# Altium PCB QKD-LD-002-OLD.PcbDoc
Units mm, origin at the board's own origin, x right, y up, seen from the top; angles counter-clockwise.
Board outline 57.48 x 32.21 mm, 2 copper layers (Top Layer, Bottom Layer); 46 components, 27 nets, 139 pads, 159 vias.
Unrouted connection lines stored in the file: 3.
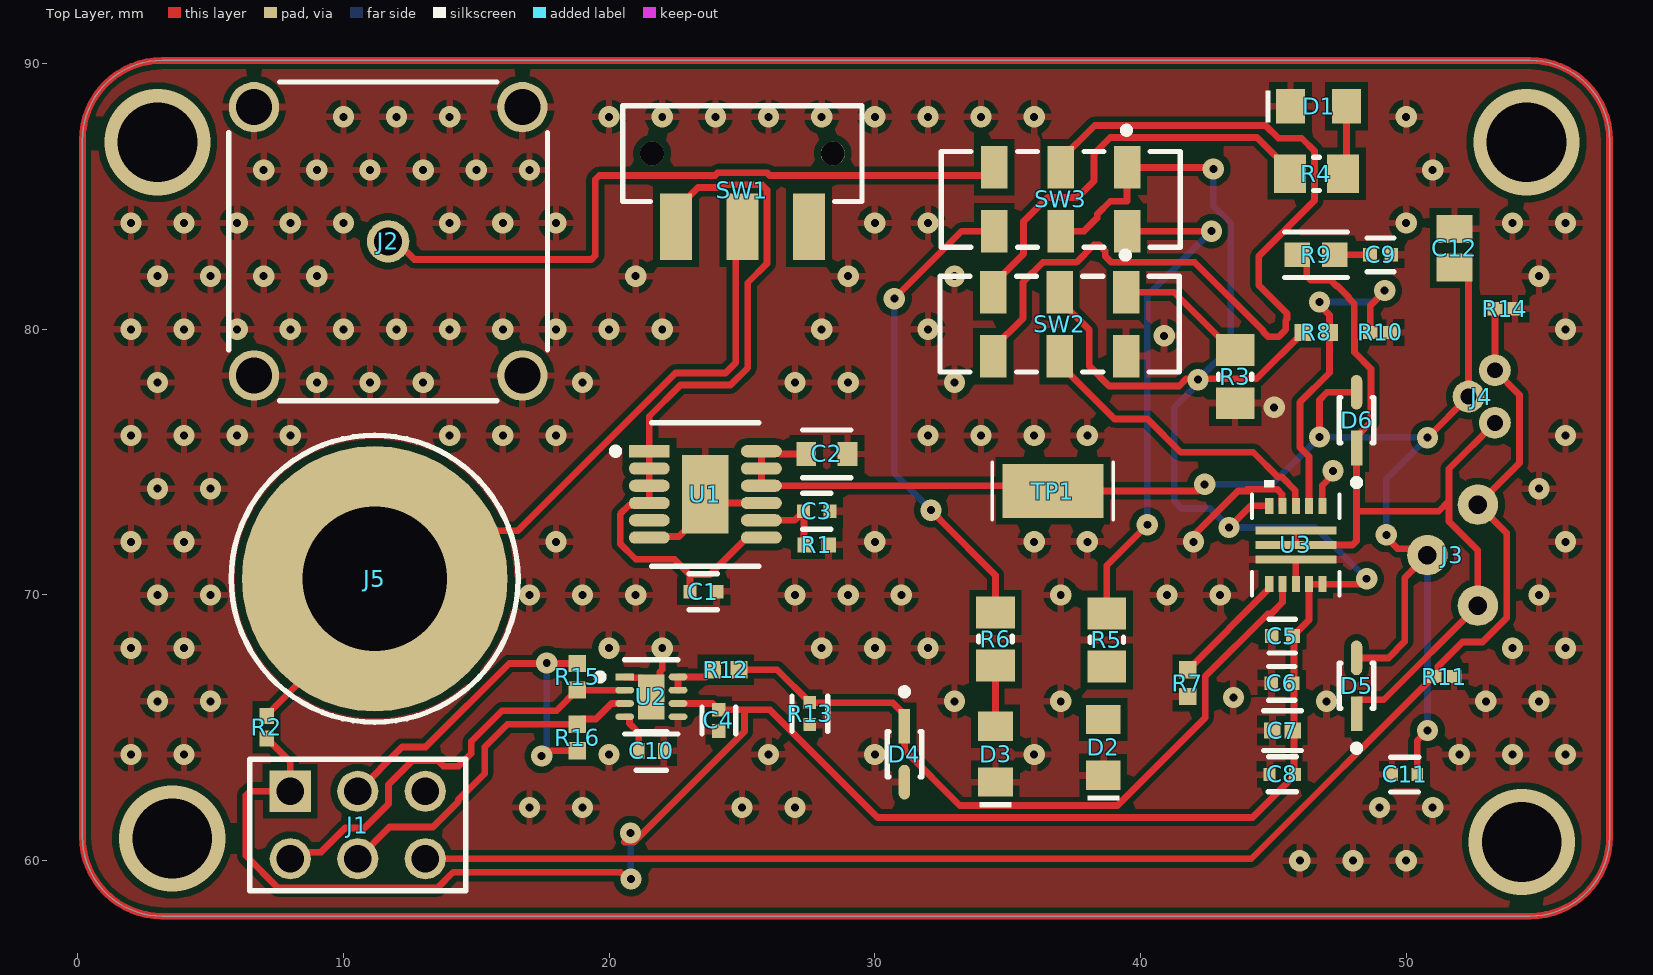
[diagram p0: Top Layer view]
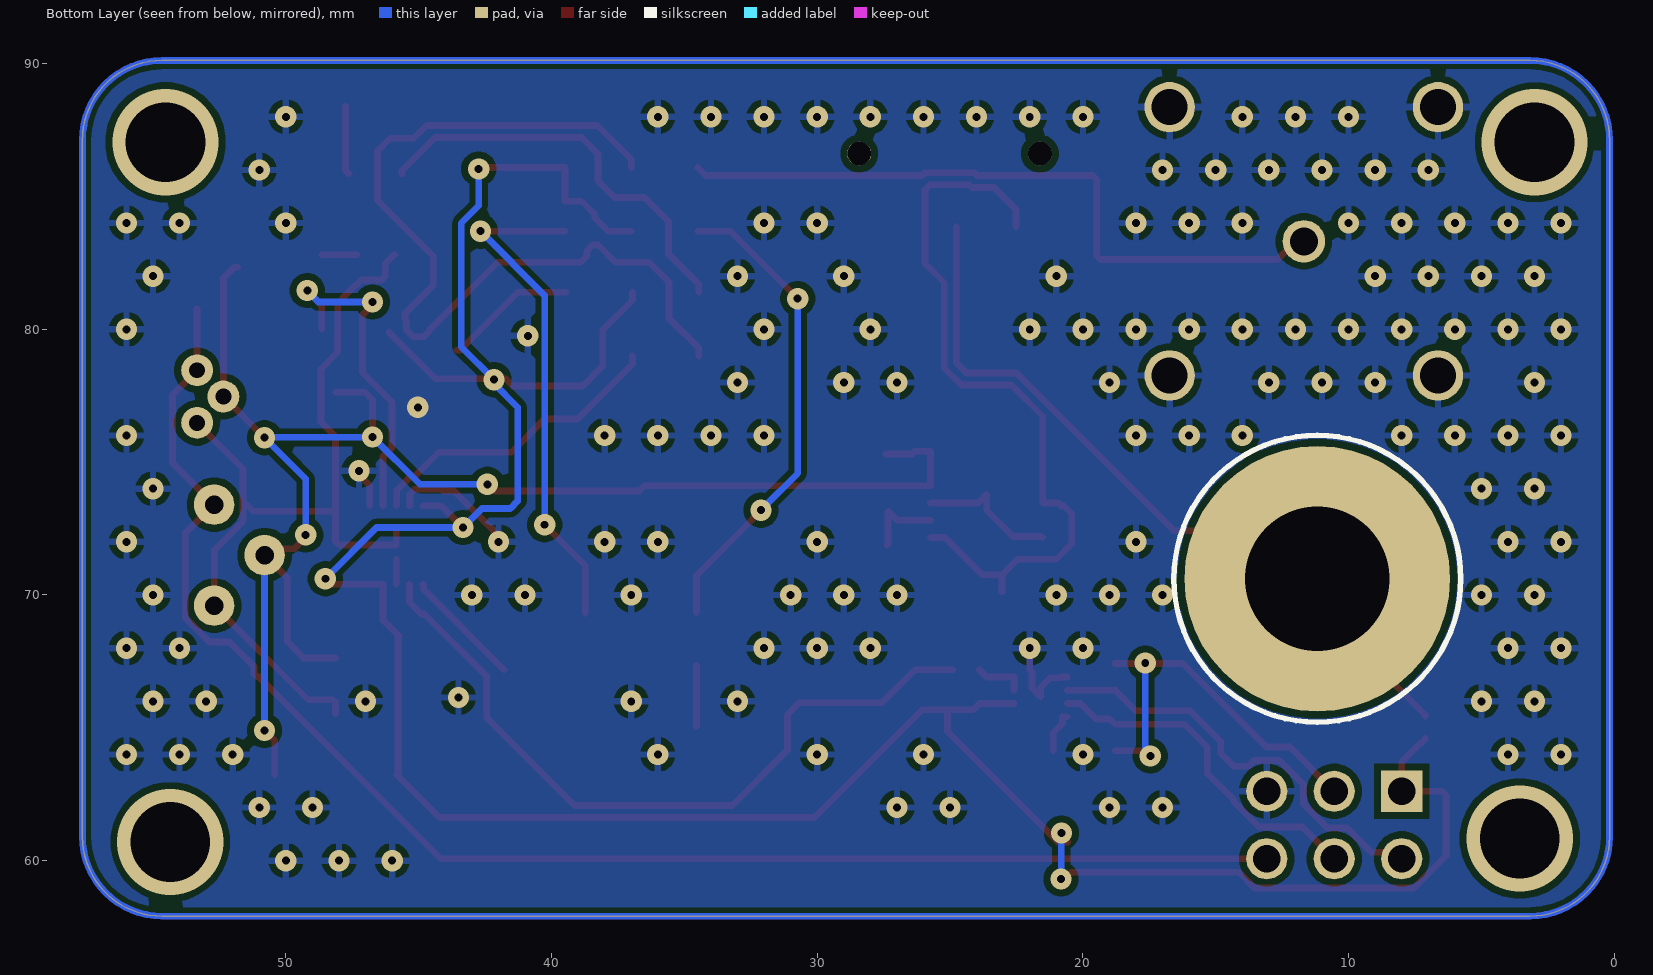
[diagram p1: Bottom Layer view, seen from below]
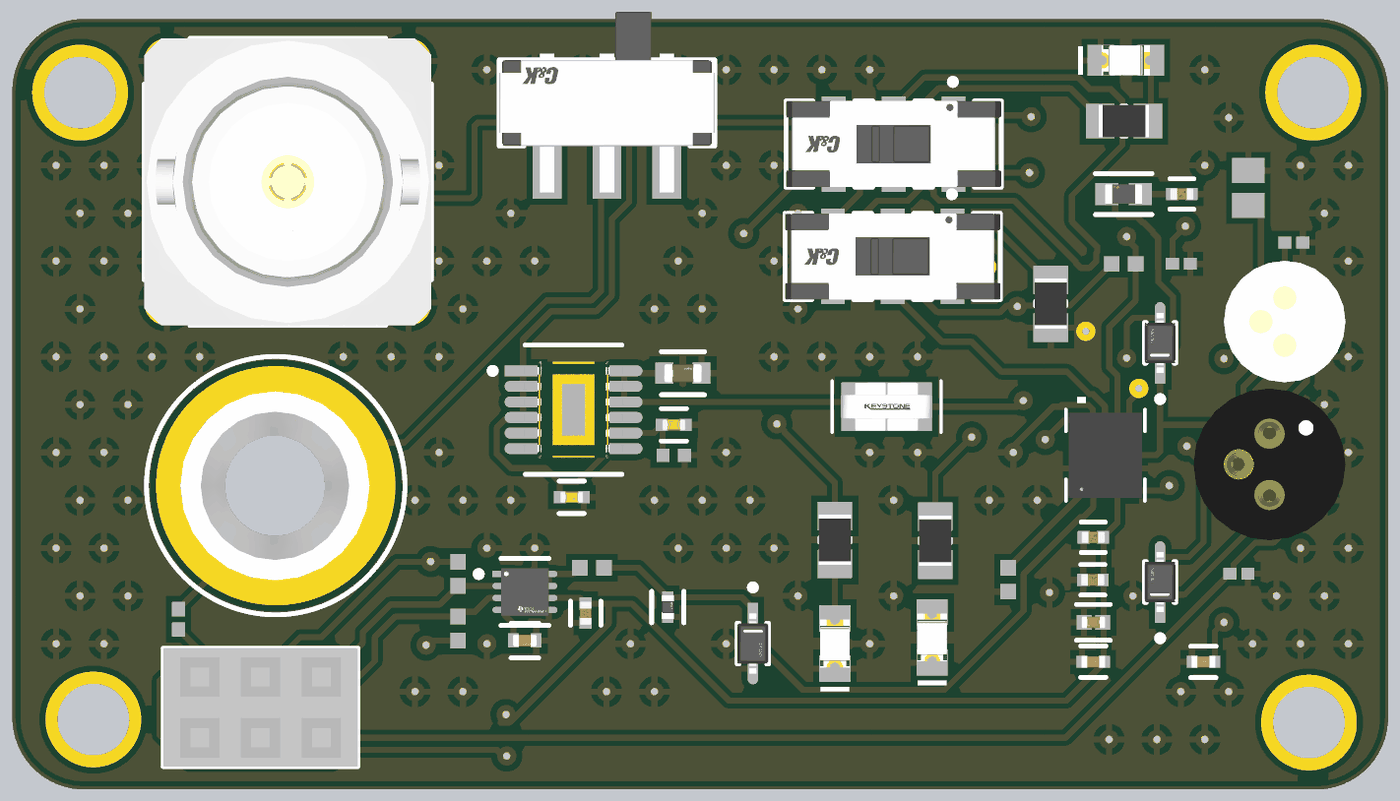
[diagram p2: 3D render of the assembled board from above, using the file's embedded part models]

## Layer stack, top to bottom
Top Solder: solder mask 0.0102, Solder Resist, Dk 3.5
Top Layer: signal copper 0.0356
Dielectric 1: dielectric 0.32, FR-4, Dk 4.8
Bottom Layer: signal copper 0.0356
Bottom Solder: solder mask 0.0102, Solder Resist, Dk 3.5

## Board outline
0.175,60.912 0.175,87.122 cw(c3.175,87.122) 3.175,90.122 54.658,90.122 cw(c54.658,87.122) 57.658,87.122 57.658,60.912 cw(c54.658,60.912) 54.658,57.912 3.175,57.912 cw(c3.175,60.912)

## Design rules (kind name [scope] priority, off if disabled: settings)
Clearance [All] p1: gap=0.254 ignorepadtopadclearanceinfootprint=FALSE except(0.2: Arc-Arc Arc-Track Arc-SMDPad Arc-THPad Arc-Via Arc-Fill Arc-Poly Arc-Region Arc-Text Arc-Hole Track-Track Track-SMDPad Track-THPad Track-Via Track-Fill Track-Poly Track-Region Track-Text Track-Hole)
PolygonConnect [All] p1: connectstyle=Relief reliefconductorwidth=0.254 reliefentries=4 polygonreliefangle="90 Angle" airgapwidth=0.254
RoutingVias [All] p1: holewidth=0.711 width=1.27 viastyle="Through Hole" minholewidth=0.711 minwidth=1.27 maxholewidth=0.711 maxwidth=1.27
SolderMaskExpansion [All] p1: expansion=0 istentingtop=FALSE
SupplyNets "Schematic Supply Nets_1" [InNet('GND')] p1: voltage=0.000
SupplyNets "Schematic Supply Nets" [InNet('VBIAS')] p2: voltage=0.000
Width [All] p1: maxlimit=0.254 minlimit=0.254 preferedwidth=0.254
30 further rules are at their usual default settings.

## Classes and differential pairs
component class "Power Regulation and Interfaces": C1 C2 C3 D1 D2 D3 J2 J5 R1 R2 R3 R4 R5 R6 SW1 SW2 SW3 TP1 U1
component class "Laser Driver": C4 C5 C6 C7 C8 C9 C10 C11 C12 D4 D5 D6 J3 J4 R7 R8 R9 R10 R11 R12 R13 R14 R15 R16 U2 U3

## Components (designator, comment, footprint, x,y, rotation, side; value= is the part's Value field where it differs from the comment)
C1 "4.7u" FP-CC0402-MFG 23.547,70.127 r0 top value="4.7 uF"
C2 "47 uF" FP-GRM188-0_2-MFG 28.194,75.311 r0 top
C3 "4.7u" FP-CC0402-MFG 27.813,73.152 r180 top value="4.7 uF"
C4 "100nF" FP-C0402-BB-MFG 24.13,65.278 r270 top value="0.10 μF"
C5 "100nF" FP-C0402-BB-MFG 45.339,68.453 r0 top value="0.10 μF"
C6 "100nF" FP-C0402-BB-MFG 45.32,66.675 r0 top value="0.10 μF"
C7 "10 uF" FP-GRM155-0_2-IPC_C 45.347,64.897 r180 top
C8 "1uF" FP-0402-L_1_0_0_05-W_0_5-MFG 45.339,63.246 r180 top
C9 "100 pF" FP-C0402-BB-MFG 49.041,82.804 r0 top
C10 "2.2u" FP-GRM155-0_15-MFG 21.59,64.135 r0 top
C11 "1uF" FP-0402-L_1_0_0_05-W_0_5-MFG 49.944,63.246 r0 top
C12 "100nF" CAPC2013X145X50LL20T20 51.816,83.058 r270 top
D1 "LASER ON" WL-SMCW_0805_150080xx75000 46.702,88.392 r0 top
D2 "CW" WL-SMCW_0805_150080xx75000 38.608,64.262 r90 top
D3 "PULSE" WL-SMCW_0805_150080xx75000 34.544,64.008 r90 top
D4 "2.4V" FP-SOD323-IPC_B 31.115,64.008 r270 top
D5 "D22V0S1U2WS-7" FP-SOD323-IPC_B 48.133,66.582 r90 top
D6 "D22V0S1U2WS-7" FP-SOD323-IPC_B 48.133,76.581 r90 top
J1 "SSW-103-01-G-D" SMTC-SSW-103-01-X-D 8.001,62.611 r0 top
J2 "71K101-400A5" ROS-71K101-400A5_V 11.684,83.312 r0 top
J3 "S8060 mount" PCBComponent_1#1 53.848,70.485 r0 top
J4 "S7060R Mount" PCBComponent_1#2 53.34,77.47 r270 top
J5 "575-4" KSTN-575-4 11.176,70.612 r0 top
R1 "49.9k" RESC1005X40X25NL05T05 27.813,71.882 r180 top
R2 "0" RESC1005X40X25NL05T10 7.112,65.024 r270 top
R3 "1k" RESC2013X60X35ML10T20 43.561,78.216 r270 top
R4 "1k" RESC2013X60X35ML10T20 46.625,85.852 r0 top
R5 "1k" RESC2013X60X35ML10T20 38.735,68.31 r270 top
R6 "1k" RESC2013X60X35ML10T20 34.544,68.342 r270 top
R7 "20k" RESC1005X40X25ML05T05 41.783,66.683 r90 top
R8 "20k" RESC1005X40X25ML05T05 46.617,79.883 r180 top
R9 "10" FP-TFCR0603-IPC_B 46.609,82.804 r0 top
R10 "10k" RESC1005X40X25LL10T10 49.022,79.883 r180 top
R11 "10k" RESC1005X40X25LL10T10 51.429,66.929 r180 top
R12 "20k" RESC1005X40X25ML05T05 24.392,67.183 r0 top
R13 "1.8k" FP-RN73R1E-IPC_C 27.559,65.532 r90 top
R14 "10k" RESC1005X40X25LL10T10 53.721,80.772 r180 top
R15 "20k" RESC1005X40X25ML05T05 18.796,66.921 r90 top
R16 "20k" RESC1005X40X25ML05T05 18.796,64.635 r270 top
SW1 "JS102011SAQN" FP-JS102011SAQN-MFG 25.019,86.614 r180 top
SW2 "JS202011JCQN" FP-JS202011JCQN-MFG 36.957,80.194 r180 top
SW3 "JS202011JCQN" FP-JS202011JCQN-MFG 36.997,84.893 r180 top
TP1 "5019" 5019_MFG 36.703,73.914 r0 top
U1 "LT3045EMSE#TRPBF" FP-MSE-12-05-08-1666-IPC_B 23.622,73.787 r0 top
U2 "DAC53701DSGR" FP-DSG0008A-IPC_B 21.59,66.167 r0 top
U3 "LMH13000RQER" XLMH13000RQER.A_WQFN-HR_TXI_TEX 45.847,71.882 r90 top

## Footprints (in the part's own frame and the unit in brackets; to place one, negate y for a bottom-side part, rotate by r counter-clockwise, add the part's x,y. Pads: shape width x height; smd on the part's side, far side on the other; paste and mask are expansions set on the pad)
5019_MFG [mm] "Recommended Land Pattern"
  rect 3.8x2.03 smd paste+0 mask+0: 1(0,0)
  silkscreen extent -2.27,-1.08 2.27,1.08, body extent -1.91,-1.01 1.91,1.01, height 2.42
CAPC2013X145X50LL20T20 [mm] "Chip Capacitor, 2-Leads, Body 2.00x1.25mm, IPC High Density"
  rect 1.05x1.35 smd: 1(-0.725,0) 2(0.725,0)
  body extent -1.1,-0.72 1.1,0.72, height 1.45
FP-0402-L_1_0_0_05-W_0_5-MFG [mm]
  rect 0.45x0.5 smd paste+0 mask+0: 1(-0.475,0) 2(0.475,0)
  silkscreen extent -0.53,-0.66 0.53,0.65, body extent -0.8,-0.38 0.8,0.38, height 0.25
FP-C0402-BB-MFG [mm]
  rect 0.52x0.52 smd paste+0 mask+0: 1(-0.4,0) 2(0.4,0)
  silkscreen extent -0.5,-0.64 0.5,0.64, body extent -0.8,-0.4 0.8,0.4, height 0.25
FP-CC0402-MFG [mm]
  rect 0.5x0.5 smd paste+0 mask+0: 1(-0.5,0) 2(0.5,0)
  silkscreen extent -0.53,-0.68 0.53,0.67, body extent -0.87,-0.48 0.87,0.48, height 0.25
FP-DSG0008A-IPC_B [mm]
  rect 0.706x0.257 smd paste+0 mask+0: 1(-1.003,0.75)
  rrect100% 0.706x0.257 smd paste+0 mask+0: 2(-1.003,0.25) 3(-1.003,-0.25) 4(-1.003,-0.75) 5(1.003,-0.75) 6(1.003,-0.25) 7(1.003,0.25) 8(1.003,0.75)
  rect 1x1.7 smd paste-1000 mask+0: 9(0,0)
  silkscreen extent -2.06,-1.4 1,1.4, body extent -1.61,-1.25 1.61,1.25, height 0.25
FP-GRM155-0_2-IPC_C [mm]
  rect 0.628x0.606 smd paste+0 mask+0: 1(-0.389,0) 2(0.389,0)
  silkscreen extent -0.7,-0.75 0.7,0.75, body extent -0.8,-0.45 0.8,0.45, height 0.25
FP-GRM155-0_15-MFG [mm]
  rect 0.45x0.6 smd paste+0 mask+0: 1(-0.475,0) 2(0.475,0)
  silkscreen extent -0.58,-0.73 0.58,0.72, body extent -0.8,-0.43 0.8,0.43, height 0.25
FP-GRM188-0_2-MFG [mm]
  rect 0.75x0.9 smd paste+0 mask+0: 1(-0.775,0) 2(0.775,0)
  silkscreen extent -0.9,-0.9 0.9,0.9, body extent -1.25,-0.6 1.25,0.6, height 0.25
FP-JS102011SAQN-MFG [mm]
  rect 1.2x2.5 smd paste+0 mask+0: 1(-2.5,2.75) 2(0,2.75) 3(2.5,2.75)
  round 0.9 hole 0.9 unplated paste-2539.97 mask+0: ""(-3.4,0) ""(3.4,0)
  silkscreen extent -4.5,-1.8 4.5,1.8, body extent -4.6,-3.9 4.6,4.1, height 0.25
FP-JS202011JCQN-MFG [mm]
  rect 1x1.6 smd paste+0 mask+0: 1(-2.5,-1.2) 2(0,-1.2) 3(2.5,-1.2) 5(-2.5,1.2) 6(0,1.2) 7(2.5,1.2)
  silkscreen extent -4.5,-2.72 4.5,1.8, body extent -4.6,-2.1 4.6,2.1, height 0.25
FP-MSE-12-05-08-1666-IPC_B [mm]
  rect 1.54x0.455 smd paste+0 mask+0: 1(-2.11,1.625)
  rrect100% 1.54x0.455 smd paste+0 mask+0: 2(-2.11,0.975) 3(-2.11,0.325) 4(-2.11,-0.325) 5(-2.11,-0.975) 6(-2.11,-1.625) 7(2.11,-1.625) 8(2.11,-0.975) 9(2.11,-0.325) 10(2.11,0.325) 11(2.11,0.975) 12(2.11,1.625)
  rect 1.753x2.947 smd paste-1000 mask+0: 13(0,0)
  silkscreen extent -3.5,-2.7 2.02,2.7, body extent -3.13,-2.27 3.13,2.27, height 0.25
FP-RN73R1E-IPC_C [mm]
  rect 0.488x0.472 smd paste+0 mask+0: 1(-0.414,0) 2(0.414,0)
  silkscreen extent -0.66,-0.67 0.66,0.67, body extent -0.76,-0.38 0.76,0.38, height 0.25
FP-SOD323-IPC_B [mm]
  rect 1.306x0.432 smd paste+0 mask+0: 1(-1.05,0)
  rrect100% 1.306x0.432 smd paste+0 mask+0: 2(1.05,0)
  silkscreen extent -2.47,-0.65 0.85,0.65, body extent -1.95,-0.9 1.95,0.9, height 0.25
FP-TFCR0603-IPC_B [mm]
  rect 0.958x0.912 smd paste+0 mask+0: 1(-0.702,0) 2(0.702,0)
  silkscreen extent -1.18,-0.86 1.18,0.86, body extent -1.43,-0.71 1.43,0.71, height 0.25
KSTN-575-4 [mm] "Banana Jack, Non-Insulated, Dia 7.92mm"
  round 10 hole 5.45: 1(0,0)
  silkscreen extent -5.4,-5.4 5.4,5.4, body extent -3.98,-3.96 3.92,3.94, height 2.36
PCBComponent_1#1 [mil]
  round 60 hole 27.56: 1(-45.2,114.8) 3(-45.2,-34.8) ""(-120,40)
  body extent -170,-85 80,165, height 190
PCBComponent_1#2 [mil]
  round 47.24 hole 23.62: 1(-38.98,0) 2(0,-38.98) 3(38.98,0)
  body extent -100,-100 100,100, height 198
RESC1005X40X25LL10T10 [mm] "Chip Resistor, 2-Leads, Body 1.00x0.50mm, IPC High Density"
  rect 0.55x0.5 smd: 1(-0.375,0) 2(0.375,0)
  body extent -0.55,-0.3 0.55,0.3, height 0.4
RESC1005X40X25ML05T05 [mm] "Chip Resistor, 2-Leads, Body 1.00x0.50mm, IPC Low Density"
  rect 0.65x0.65 smd: 1(-0.5,0) 2(0.5,0)
  body extent -0.53,-0.27 0.53,0.28, height 0.4
RESC1005X40X25NL05T05 [mm] "Chip Resistor, 2-Leads, Body 1.00x0.50mm, IPC Medium Density"
  rect 0.55x0.55 smd: 1(-0.45,0) 2(0.45,0)
  body extent -0.53,-0.27 0.53,0.28, height 0.4
RESC1005X40X25NL05T10 [mm] "Chip Resistor, 2-Leads, Body 1.00x0.50mm, IPC Medium Density"
  rect 0.6x0.55 smd: 1(-0.425,0) 2(0.425,0)
  body extent -0.53,-0.27 0.53,0.28, height 0.4
RESC2013X60X35ML10T20 [mm] "Chip Resistor, 2-Leads, Body 2.1x1.35mm, IPC Low Density"
  rect 1.2x1.45 smd: 1(-1,0) 2(1,0)
  silkscreen extent -0.1,-0.63 0.1,0.63, body extent -1.05,-0.68 1.05,0.67, height 0.6
ROS-71K101-400A5_V [mm] "75R BNC, Straight Jack, 12x12x15mm, Rosenberger Recommended"
  round 1.6 hole 1.05: 1(0,0)
  round 1.9 hole 1.35: MH(-5.05,-5.05) MH(-5.05,5.05) MH(5.05,-5.05) MH(5.05,5.05)
  silkscreen extent -6,-6 6,6, body extent -6,-6 6,6, height 15
SMTC-SSW-103-01-X-D [mm] "SQ Post Socket, 2x3 Pins, Vertical, 2.54mm Pitch, Female"
  rect 1.55x1.55 hole 1.04: 1(0,0)
  round 1.55 hole 1.04: 2(0,-2.54) 3(2.54,0) 4(2.54,-2.54) 5(5.08,0) 6(5.08,-2.54)
  silkscreen extent -1.53,-3.74 6.61,1.2, body extent -1.52,-3.75 6.6,1.21, height 8.51
WL-SMCW_0805_150080xx75000 [mm] "SMD Mono-color Chip LED, body 2.0x1.25mm"
  rect 1.1x1.3 smd: 1(-1.05,0) 2(1.05,0)
  silkscreen extent -2,-0.6 -1.8,0.6, body extent -1,-0.63 1,0.62, height 0.7
XLMH13000RQER.A_WQFN-HR_TXI_TEX [mm]
  rect 0.6x0.305 smd paste+0 mask+0: 1(-1.475,1) 2(-1.475,0.5) 3(-1.475,0) 4(-1.475,-0.5) 5(-1.475,-1) 9(1.475,-1) 10(1.475,-0.5) 11(1.475,0) 12(1.475,0.5) 13(1.475,1)
  rect 0.305x3.048 smd paste+0 mask+0: 6(-0.55,0) 7(0,0) 8(0.55,0)
  silkscreen extent -1.91,-1.65 2.44,1.65, body extent -1.78,-1.52 1.78,1.52, height 0.81

## Part data
C1 C3: library part CMP-03422-001389-1, "CAP CER 4.7UF 6.3V X5R 0402", Capacitance="4.7 uF", Manufacturer=YAGEO, Manufacturer Part Number=CC0402KRX5R5BB475, Package=CC0402, Temperature="-55°C to +125°C", Temperature Characteristic=X5R, Temperature Coefficient=30ppm/°C, Temperature Range High=+125°C, Temperature Range Low=-55°C, Tolerance=0.1, Voltage Rating="6.3 V", Automotive=No, Automotive Grade=NA, Category=Cap, ComponentLink2Description=Datasheet, ComponentLink2URL=http://www.yageo.com/documents/recent/UPY-GP_NP0_16V-to-50V_16.pdf, Device Class L1="Passive Components", Device Class L2=Capacitors, Device Class L3="Ceramic Capacitors", Digikey Description="CAP CER 4.7UF 6.3V X5R 0402", Footprint Url=http://www.yageo.com/exep/pages/download/literatures/UPY-C_GEN_24.pdf, Height=0.55mm, Ipc Land Pattern Name=CAPC10050X50, Lead Free=Yes, Material=Ceramic, Mouser Description="0402 4.7 uF 6.3 V ±10% Tolerance X5R SMT Multilayer Ceramic Capacitor", Octopart=https://octopart.com/cc0402krx5r5bb475-yageo-71498076, RoHS=TRUE
C2: library part CMP-06035-023005-1, "Chip Multilayer Ceramic Capacitors for General Purpose, 0603, 47uF, X5R, 15%, 20%, 6.3V"
C4 C5 C6: library part CMP-1034-02069-4, "CAP CER 0.1UF 16V 10% X5R 0402", Capacitance="0.10 μF", Manufacturer=Kemet, Manufacturer Part Number=C0402C104K4PACTU, Package=C0402-BB, Temperature="-55°C to +125°C", Temperature Characteristic=X5R, Temperature Coefficient=15%, Temperature Range High=+125°C, Temperature Range Low=-55°C, Tolerance=0.1, Voltage Rating="16 V", Automotive=No, Category=Cap, ComponentLink2Description=Datasheet, ComponentLink2URL=https://content.kemet.com/datasheets/KEM_C1002_X7R_SMD.pdf, Device Class L1="Passive Components", Device Class L2=Capacitors, Device Class L3="Ceramic Capacitors", Digikey Description="CAP CER 0.1UF 16V 10% X5R 0402", Height=0.55mm, Ipc Land Pattern Name=CAPC10050X50, Lead Free=Yes, Material=Ceramic, Mouser Description="Multilayer Ceramic Capacitors MLCC - SMD/SMT 16volts 0.1uF 10% X5R", Octopart=https://octopart.com/c0402c104k4pactu-kemet-8375715, RoHS=TRUE
C7: library part CMP-06035-053439-1, "Chip Multilayer Ceramic Capacitors for General Purpose, 0402, 10uF, X5R, 15%, 20%, 10V"
C8 C11: library part CMP-14477-003599-2, "None", RoHS Compliant=Yes
C9: library part CMP-03020-017256-1, "C0402 100 pF U2J 2.00% 10 V", Manufacturer=Kemet, Manufacturer Part Number=C0402C101G8JACAUTO, Package=C0402-BB, Temperature="-55°C to +125°C", Temperature Characteristic=U2J, Temperature Coefficient=15%, Temperature Range High=+125°C, Temperature Range Low=-55°C, Tolerance=0.02, Voltage Rating="10 V", Automotive=No, Capacitance="100 pF", Category=Cap, ComponentLink2Description=Datasheet, ComponentLink2URL=https://content.kemet.com/datasheets/KEM_C1002_X7R_SMD.pdf, Device Class L1="Passive Components", Device Class L2=Capacitors, Device Class L3="Ceramic Capacitors", Height=0.55mm, Ipc Land Pattern Name=CAPC10050X50, Lead Free=Yes, Material=Ceramic, Octopart=https://octopart.com/c0402c101g8jacauto-kemet-84730079, RoHS=TRUE
C10: library part CMP-06035-015498-1, "Chip Multilayer Ceramic Capacitors for General Purpose, 0402, 2.2uF, X7T, +22%/-33%, 20%, 16V"
C12: library part CMP-2007-01396-1, Manufacturer=Vitramon, Part Number=VJ0805Y104JXXPW1BC
D1: library part CMP-1426-00011-5, "LED Uni-Color Red 630nm 2-Pin Chip 0805(2012Metric) T/R", Case Code (Imperial)=0805, Case Code (Metric)=2012, Color=Red, Forward Current=100mA, Forward Voltage=2V, Manufacturer Lifecycle Status=ACTIVE, Manufacturer Package Identifier="0805 (2012 metric)", Max Junction Temperature (Tj)=95°C, Max Operating Temperature=85°C, Max Reverse Voltage (DC)=5V, Min Operating Temperature=-40°C, Power Dissipation=72mW, Test Current=20mA, Case/Package=0805, Dominant Wavelength=625nm, Height=700µm, Length=2mm, Lens Style="Clear, Rectangular", Lifecycle Status=Production, Luminous Intensity=150mcd, Mount="Surface Mount", Packaging="Tape and Reel", Peak Wavelength=630nm, REACH SVHC=Unknown, RoHS=Compliant, Viewing Angle=140°, Wavelength=625nm, Width=1.25mm, YEOL="1 = Estimated lifetime > 10 years"
D2: library part CMP-1426-00007-5, "WURTH ELEKTRONIK - 150080GS75000 - LED, Green, SMD, 0805, 30 mA, 3.2 V, 520 nm", Case Code (Imperial)=0805, Case Code (Metric)=2012, Color=Green, Forward Current=100mA, Forward Voltage=3.2V, Manufacturer Lifecycle Status=ACTIVE, Manufacturer Package Identifier="0805 (2012 metric)", Max Junction Temperature (Tj)=95°C, Max Operating Temperature=85°C, Max Reverse Voltage (DC)=5V, Min Operating Temperature=-40°C, Power Dissipation=105mW, Test Current=20mA, Case/Package=0805, Dominant Wavelength=525nm, Height=700µm, Length=2mm, Lens Style="Clear, Rectangular", Lifecycle Status=Production, Luminous Intensity=450mcd, Mount="Surface Mount", Packaging="Tape and Reel", Peak Wavelength=515nm, REACH SVHC=Unknown, Reverse Voltage=5V, RoHS=Compliant, Viewing Angle=140°, Wavelength=525nm, Width=1.25mm, YEOL="1 = Estimated lifetime > 10 years"
D3: library part CMP-1426-00008-9, "Wurth Elektronik Blue LED, WL-SMCW Series, 0805 (2012), 470nm, 2x1.25x0.7mm", Case Code (Imperial)=0805, Case Code (Metric)=2012, Color=Blue, Forward Current=100mA, Forward Voltage=3.2V, Manufacturer Lifecycle Status=ACTIVE, Manufacturer Package Identifier="0805 (2012 metric)", Max Junction Temperature (Tj)=95°C, Max Operating Temperature=85°C, Max Reverse Voltage (DC)=5V, Min Operating Temperature=-40°C, Power Dissipation=105mW, Test Current=20mA, Case/Package=0805, Dominant Wavelength=470nm, Height=700µm, Lead Free="Lead Free", Length=2mm, Lens Style="Clear, Rectangular", Lifecycle Status=Production, Luminous Intensity=145mcd, Mount="Surface Mount", Packaging="Tape and Reel", Peak Wavelength=465nm, REACH SVHC=Unknown, Reverse Voltage=5V, RoHS=Compliant, Viewing Angle=140°, Wavelength=470nm, Width=1.25mm, YEOL="1 = Estimated lifetime > 10 years"
D4: library part CMP-12792-000028-1, "DIODE ZENER 2.4V 200MW SOD323", Max Operating Temperature=150°C, Max Power Dissipation=200mW, Max Reverse Leakage Current=50uA, Min Operating Temperature=-65°C, Output Current=50mA, Package Quantity=3000, Test Current=5mA, Tolerance=8%, Contact Plating=Tin, Element Configuration=Single, ESD Protection=No, Height=1mm, Impedance=100R, Lead Free="Lead Free", Length=1.8mm, Mount="Surface Mount", Number of Pins=2, Packaging="Tape and Reel", Peak Reverse Current=50uA, Power Dissipation=200mW, Power Rating=200mW, Radiation Hardening=No, REACH SVHC="No SVHC", Termination=SMD/SMT, Voltage Rating (DC)=2.4V, Voltage Tolerance=8%, Weight=0.000173oz, Width=1.4mm, Zener Current=5mA, Zener Voltage=2.4V
D5 D6: library part CMP-12828-000026-1, "TVS DIODE 22V 37V SOD323", Clamping Voltage=37V, Max Operating Temperature=125°C, Min Breakdown Voltage=24V, Min Operating Temperature=-55°C, Peak Pulse Current=30A, Peak Pulse Power=1kW, Power Line Protection=No, Reverse Standoff Voltage=22V, Composition=Zener, Mount="Surface Mount", Number of Unidirectional Channels=1, Packaging="Tape and Reel"
J1: library part CMP-1023-00331-1, "SQ Post Socket, Through-hole, Vertical, -55 to 125 degC, 2.54 mm Pitch, 6-Pin, Female, RoHS", Manufacturer=Samtec, Temperature Range="-55 to 125 degC", ComponentLink1Description="Manufacturer URL", ComponentLink1URL=http://www.samtec.com, ComponentLink2Description=Datasheet, ComponentLink2URL=http://www.samtec.com/documents/webfiles/pdf/SSW_TH.PDF, ComponentLink3Description="Package Specification", ComponentLink3URL=http://www.samtec.com/documents/webfiles/cpdf/SSW-1XX-XX-XXX-X-XX-XXX-XX-MKT.pdf, DatasheetVersion=F-214, Mounting Technology=Through-hole, Orientation=Vertical, PackageDescription="Assembly, Socket Strip .016 X .031 Tail", PackageReference=SSW-103-01-X-D, PackageVersion="CA, 6/1987", PartNumber=SSW-103-01-G-D, Pitch="2.54 mm", RoHS=True
J2: library part CMP-2000-05853-1, "Female Connector, Pitch 2.54 mm, 1 x 2 Position, Height 15.8 mm, Tail Length 3.8 mm,  / -55 to 85 degC, RoHS, Bulk", Frequency Max=4GHz, Manufacturer="TE Connectivity", Package Description="Female Connector, Pitch 2.54 mm, 1 x 2 Position, Height 15.8 mm, Tail Length 3.8 mm", Package Reference=1-1337543-0, Coaxial Cable Types=-, Coaxial Termination=Solder, Connector Body Style=RightAngleJack, Connector Mounting=PCBMount, Connector Type=BNCCoaxial, Contact Material=Brass, Contact Plating=GoldPlatedContacts, Datasheet URL=http://www.te.com/commerce/DocumentDelivery/DDEController?Action=showdoc&DocId=Customer+Drawing%7F1337543%7FG%7Fpdf%7FEnglish%7FENG_CD_1337543_G.pdf%7F1-1337543-0, Datasheet Version="Rev. G, 12/2012", Impedance=50ohm, Manufacturer URL=http://www.te.com/, Mounting Technology=ThroughHole, Product Range=-, SVHC=ToBeAdvised
J3 J4: library part Component_1
J5: library part CMP-2000-05649-1, "Banana Jack, Non-Insulated, 1-Pin THD, RoHS, Bulk", Color=-, Manufacturer=Keystone-Electronics, Package Description="1-Pin Through Hole Device, Dia 7.92 mm", Package Version="Rev. B, 11/1994", Body Material=-, Category=Connectors,Interconnects, Contact Finish=Nickel, Contact Material=Brass, Datasheet URL=http://www.keyelco.com/product-pdf.cfm?p=2379, Datasheet Version="Rev. B, 11/1994", Family=BananaandTipConnectors-Jacks,Plugs, Features=-, Gender=Female, Insulation=Non-Insulated, Manufacturer URL=http://www.keyelco.com/, Mounting Technology=ThroughHole, Mounting Type=ThroughHole, Operating Temperature=-, Package Reference=575-4, Package URL=http://www.keyelco.com/product-pdf.cfm?p=2379, Packaging=Bulk, Plug/Mating Plug Diameter=StandardBanana, Series=-, Termination=Solder, Type=BananaJack, Wire Gauge=-
R1: library part CMP-2002-00036-1, Manufacturer="Vishay Dale", Part Number=CRCW0402499KFKTD
R2: library part CMP-1011-00001-2, Manufacturer="Yageo / Phycomp", Part Number=RC0402JR-070RL
R3 R4 R5 R6: library part CMP-2100-03671-1, "Chip Resistor, 1 KOhm, +/- 1%, 125 mW, -55 to 155 degC, 0805 (2012 Metric), RoHS, Tape and Reel", Case Code (Imperial)=0805, Case Code (Metric)=2012, Manufacturer=Yageo, Max Operating Temperature=155degC, Max Power Dissipation=125mW, Min Operating Temperature=-55degC, Package Description="2-Pin Surface Mounted Device, Body 2 x 1.25 mm", Package Quantity=1, Resistance=1KOhm, Temperature Coefficient=100ppm/degreesC, Tolerance=1%, Voltage Rating=150V, Case/Package=0805, Composition=ThickFilm, Datasheet URL=http://www.yageo.com/NewPortal/yageodocoutput?fileName=/pdf/R-Chip/PYu-RC_Group_51_RoHS_L_5.pdf, Datasheet Version="Rev. 5, 10/2016", Depth=1.25mm, Height=0.024inch, Lead Free=LeadFree, Length=0.079inch, Manufacturer URL=http://www.yageo.com/, Military Standard=Not, Number of Pins=2, Number of Terminations=2, Package Reference=0805, Packaging=TapeandReel, Power Rating=125mW, REACH SVHC=Unknown, RoHSCompliant=true, Termination=SMD/SMT, Voltage Rating (DC)=150V, Width=0.049inch
R7 R8 R12 R15 R16: library part CMP-2002-08357-1, Manufacturer="Vishay Dale", Part Number=CRCW040220K0FKTD
R9: library part CMP-250906-269177-1, "RES Thin Film,  10Ω, 0.5%, 0.1W, 50ppm/°C, 0603"
R10 R11 R14: library part CMP-2002-04584-1, Manufacturer="KOA Speer", Part Number=SG73P1ETTP1002F
R13: library part CMP-04015-046155-1, "1.8kΩ ±0.1% 0.063W, 1/16W Chip Resistor 0402 (1005 Metric) Moisture Resistant Thin Film"
SW1: library part CMP-2000-06501-2, "SWITCH SLIDE SPDT 300MA 6V", Case/Package=100, Contact Current Rating=300mA, Contact Resistance=70mR, Max Operating Temperature=85°C, Max Voltage Rating (DC)=6V, Min Operating Temperature=-40°C, Package Quantity=1, Actuator Length=2mm, Actuator Material=Nylon, Actuator Type=Standard, Contact Material="Copper Alloy", Contact Plating=Silver, Current Rating=300mA, Electrical Life=5000Cycles, Housing Material=Nylon, Illumination Type=Non-Illuminated, Lead Free="Lead Free", Length=9mm, Max Current Rating=300mA, Mount="Surface Mount", Orientation="Right Angle", Packaging="Tape and Reel", Radiation Hardening=No, REACH SVHC="No SVHC", Switch Function=On-On, Switch Travel=2mm, Termination="Gull Wing", Throw Configuration=SPDT, Voltage Rating (DC)=6V
SW2 SW3: library part CMP-10038-000009-1, "SWITCH SLIDE DPDT 300MA 6V", Current Rating=300mA, Max Operating Temperature=85°C, Min Operating Temperature=-40°C, Voltage Rating (DC)=6V, Actuator Length=2mm, Actuator Material=Nylon, Actuator Type=Standard, Contact Material="Copper Alloy", Contact Plating=Silver, Electrical Life=5000Cycles, Mount="Surface Mount", Packaging="Cut Tape", Switch Function=On-On, Switch Travel=2mm, Throw Configuration=DPDT
TP1: library part CMP-1672-00008-3, "Phosphor Bronze Contact Miniature Silver Plated Surface Mount Test Points", China RoHS=Compliant, ComponentLink1Description="Manufacturer's Website", ComponentLink1URL=http://www.keyelco.com/, ComponentLink2Description="Datasheet URL", ComponentLink2URL=https://www.keyelco.com/product-pdf.cfm?p=1357, Contact Material=Silver, Contact Plating=Silver, Height=2.42mm, HelpURL=https://www.keyelco.com/product-pdf.cfm?p=1357, Lead Free="Lead Free", Lifecycle Status=Production, Material=Bronze, Mount="Surface Mount", Number of Contacts=1, Number of Pins=1, Packaging="Tape and Reel", REACH SVHC=Yes, RoHS=Compliant, Termination=SMD/SMT
U1: library part CMP-09138-000053-1, "IC REG LINEAR 0V 500MA 12MSOP", Case/Package=MSOP, RoHS Compliant=Yes
U2: library part CMP-04861-000027-1, "10-Bit and 8-Bit, Voltage-Output Smart DACs With Nonvolatile Memory and PMBus™ Compatible I2C Interface With GPI Control", RoHS Compliant=Yes
U3: "High-speed, voltage-controlled current output driver 13-WQFN-HR -40 to 125", Manufacturer_Name="Texas Instruments", Copyright="Copyright (C) 2025 Ultra Librarian. All rights reserved.", Manufacturer_Part_Number=LMH13000RQER, RefDes=RefDes, Type=Type

## Via types
v1: diameter 0.8, hole 0.3, Top Layer to Bottom Layer, tented both sides, 152 vias
v2: diameter 4, hole 3, Top Layer to Bottom Layer, 4 vias
v3: diameter 0.8, hole 0.3, Top Layer to Bottom Layer, 3 vias

## Nets (pads, with @x,y where several pads share a name; then routed paths per layer and width w, separated by ;. In a path a pad name is that pad's centre, name@x,y a point inside that pad or via, vN(x,y) a via of type N, cw(c..) or ccw(c..) an arc to the next point about the centre after c; other vN are vias at no path point)
+3V3: J1.3 R15.2 R16.2 | length 15.5
  Top Layer w0.254: J1.3 12.205,64.275 13.094,64.275 16.24,67.421 17.653,67.421 R15.2 ; v1@17.272,63.754 17.653,64.135 R16.2
  Bottom Layer w0.254: v1(17.462,63.944) 17.462,64.092 17.653,64.283 v1(17.653,67.437)
+5V0: C4.1 C5.2 C6.2 C7.1 C8.1 J1.1 R2.2 R8.2 SW2.2 SW3.1 SW3.6 U2.6 U3.4 U3.5 U3.13 | length 110
  Top Layer w0.254: R2.2 7.112,64.574 7.26,64.426 7.285,64.426 8.001,63.71 J1.1 6.477,62.611 6.328,62.462 6.328,60.185 7.545,58.969 13.537,58.969 14.131,59.563 20.426,59.563 20.68,59.309 v1(20.828,59.309) ; 20.574,60.706 20.94,60.706 25.093,64.859 25.093,65.678 ; U2.6 23.891,65.917 C4.1 25.093,65.678 ; SW2.2 36.957,81.094 38.076,79.975 38.076,78.613 38.822,77.867 41.461,77.867 41.737,78.143 44.377,78.143 R8.2 ; SW3.6 37.878,83.693 38.37,84.185 38.37,84.328 38.862,84.82 39.497,84.82 SW3.1 42.685,86.093 v1@42.799,85.979 ; v1@43.307,72.517 44.147,73.357 U3.13 ; v1(48.514,70.612) 48.309,70.407 U3.5 U3.4 46.347,69.061 C5.2 45.776,68.415 45.776,63.284 C8.1 45.814,63.221 44.22,61.627 30.107,61.627 26.056,65.678 25.093,65.678
  Bottom Layer w0.254: v1(20.802,61.039) 20.815,61.027 20.815,59.322 v1(20.828,59.309) ; v1(42.742,86.036) 42.742,84.651 43.399,83.994 43.399,79.34 v1(42.164,78.105) 42.164,77.957 41.275,77.068 41.275,73.533 41.552,73.256 42.619,73.256 v1(43.335,72.541) 46.585,72.541 v1(48.514,70.612)
GND: C1.2 C2.2 C3.1 C4.2 C5.1 C6.1 C7.2 C8.2 C9.2 C10.2 C11.1 C12.1 D1.1 D2.1 D3.1 D4.2 J1.5 J2.MH R1.1 R3.2 R7.1 R10.1 R11.1 R13.1 R14.1 SW2.5 U1.6 U1.9 U1.13 U2.1 U2.5 U2.9 U3.3 U3.6 U3.9 U3.12 | length 16.3
  Top Layer w0.254: U2.1 20.588,66.916 20.841,66.916 20.867,66.89 21.217,66.89 21.59,66.517 U2.9 21.913,66.49 21.913,67.106 22,67.193 v1(22,68) ; U1.6 21.551,72.2 22.632,72.2 23.622,73.19 U1.13 23.947,73.462 U1.9 ; v1(42,72) 42,72.24 43.674,73.914 44.069,73.914 43.999,73.984 45.135,73.984 45.326,73.792 45.326,73.378 U3.12 ; U3.3 U3.6 ; U3.9 46.847,74.131 47.244,74.528 v3(47.244,74.676)
  other v1: 46,60 48,60 50,60 17,62 19,62 25,62 27,62 49,62 51,62 2,64 4,64 20,64 26,64 30,64 36,64 52,64 54,64 56,64 3,66 5,66 33,66 37,66 47,66 53,66 55,66 43.506,66.142 2,68 4,68 20,68 28,68 30,68 32,68 54,68 56,68 3,70 5,70 17,70 19,70 21,70 27,70 29,70 31,70 37,70 41,70 43,70 55,70 2,72 4,72 18,72 30,72 36,72 38,72 56,72 3,74 5,74 55,74 2,76 4,76 6,76 8,76 14,76 16,76 18,76 32,76 34,76 36,76 38,76 56,76 3,78 9,78 11,78 13,78 19,78 27,78 29,78 33,78 2,80 4,80 6,80 8,80 10,80 12,80 14,80 16,80 18,80 20,80 22,80 28,80 32,80 56,80 3,82 5,82 7,82 9,82 21,82 29,82 33,82 55,82 2,84 4,84 6,84 8,84 10,84 14,84 16,84 18,84 30,84 32,84 50,84 54,84 56,84 7,86 9,86 11,86 13,86 15,86 17,86 51,86 10,88 12,88 14,88 20,88 22,88 24,88 26,88 28,88 30,88 32,88 34,88 36,88 50,88
  other v3: 45.032,77.065 40.894,79.756
IOUT: D5.1 D6.1 J3.3 J4.3 R9.1 U3.7 U3.8 | length 33.7
  Top Layer w0.254: U3.8 U3.7 47.984,71.882 48.133,72.031 48.133,73.152 ; R9.1 45.93,82.804 46.259,82.475 46.259,82.002 46.408,81.853 47.155,81.853 47.382,81.626 47.418,81.626 47.844,81.2 47.844,81.164 48.051,80.957 48.051,79.625 48.053,79.623 48.053,79.137 48.676,78.514 48.676,76.511 48.133,75.967 D6.1 48.133,73.152 ; D5.1 48.133,65.969 48.222,66.058 49.157,66.058 J3.3 52.7,71.675 51.611,72.764 51.611,73.535 ; J4.3 51.611,74.751 51.611,73.535 ; 48.133,73.152 51.228,73.152 51.611,73.535
LASER_CTRL: SW2.6 U3.11 | length 11.7
  Top Layer w0.254: SW2.6 36.957,78.694 39.024,76.627 40.26,76.627 41.514,75.373 44.246,75.373 45.181,74.438 45.323,74.438 45.826,73.934 45.826,73.378 U3.11
NetC1_1: C1.1 SW1.3 U1.1 U1.2 U1.3 U1.4 U1.7 | length 28.7
  Top Layer w0.254: SW1.3 22.519,84.514 23.344,85.339 24.182,85.339 24.284,85.441 25.754,85.441 25.946,85.249 25.946,82.479 25.219,81.752 25.219,78.552 24.572,77.905 22.689,77.905 21.512,76.728 U1.1 U1.2 U1.3 U1.4 20.915,73.462 20.82,73.366 20.74,73.366 20.415,73.042 20.415,71.932 21.002,71.345 22.46,71.345 23.047,70.758 ; C1.1 23.047,70.758 ; U1.7 25.189,72.162 23.785,70.758 23.047,70.758
NetC3_2: C3.2 R1.2 U1.8 | length 3
  Top Layer w0.254: U1.8 26.973,72.812 C3.2 27.338,73.127 27.338,71.907 R1.2
NetC9_1: C9.1 R9.2 | length 1.3
  Top Layer w0.254: R9.2 C9.1
NetC10_1: C10.1 U2.4 | length 1.6
  Top Layer w0.254: U2.4 20.762,65.417 20.763,65.416 20.763,65.168 21.115,64.816 C10.1
NetD1_2: D1.2 R4.2 | length 2.6
  Top Layer w0.254: R4.2 47.752,85.979 D1.2
NetD2_2: D2.2 R5.2
NetD3_2: D3.2 R6.2 | length 2.3
  Top Layer w0.254: D3.2 R6.2
NetR3_1: R3.1 SW2.1 | length 5
  Top Layer w0.254: SW2.1 41.258,81.394 43.436,79.216 R3.1
NetR4_1: R4.1 SW2.3 | length 15.7
  Top Layer w0.254: SW2.3 34.457,81.694 35.596,82.833 35.596,84.054 36.508,84.966 37.632,84.966 38.247,85.581 38.247,86.605 38.862,87.22 44.382,87.22 45.625,85.977 R4.1
NetR5_1: R5.1 SW3.5 | length 19.2
  Top Layer w0.254: R5.1 38.735,71.12 v1(40.259,72.644) ; SW3.5 v1(42.672,83.693)
  Bottom Layer w0.254: v1(40.259,72.644) 40.259,81.28 v1(42.672,83.693)
NetR6_1: R6.1 SW3.7 | length 18.2
  Top Layer w0.254: v1(30.734,81.153) 33.274,83.693 SW3.7 ; v1(32.119,73.194) 32.427,72.886 32.427,72.856 34.544,70.739 R6.1
  Bottom Layer w0.254: v1(30.734,81.153) 30.734,74.579 v1(32.119,73.194)
NetR7_2: R7.2 U3.1 | length 4.5
  Top Layer w0.254: R7.2 44.822,70.222 44.822,70.382 U3.1
NetR8_1: R8.1 R10.2 U3.10 | length 11.4
  Top Layer w0.254: U3.10 46.347,75.215 46.009,75.553 46.009,77.258 47.117,78.366 R8.1 ; R10.2@48.653,80.01 48.653,80.898 49.193,81.438 v1(49.193,81.463)
  Bottom Layer w0.254: v1(46.736,81.026) 48.771,81.026 49.193,81.448 v1(49.193,81.463)
NetR12_1: R12.1 U2.7 U2.8 | length 1.9
  Top Layer w0.254: U2.7 U2.8 23.626,66.917 R12.1
NetSW2_7: SW2.7 SW3.2 | length 34.2
  Top Layer w0.254: SW2.7 34.457,79.294 35.576,80.413 35.576,81.775 36.322,82.521 37.587,82.521 38.241,83.174 38.451,83.174 38.67,82.955 38.67,82.758 38.907,82.521 42.043,82.521 44.613,79.951 44.613,79.926 44.823,79.716 45.199,79.716 45.465,79.982 45.465,80.343 45.511,80.39 45.511,80.6 44.45,81.661 44.45,82.745 46.552,84.847 46.552,86.712 46.071,87.193 45.188,87.193 44.708,87.674 38.278,87.674 36.997,86.393 SW3.2
"PD READ": J1.6 J3.1 J4.1 R11.2 R14.2 | length 57.7
  Top Layer w0.254: J1.6 44.171,60.071 51.029,66.929 R11.2 ; R11.2@51.079,66.929 51.202,67.052 51.202,67.314 52.12,68.232 52.871,68.232 53.789,69.15 53.789,72.312 J3.1 54.267,74.968 54.267,77.533 J4.1 53.343,78.463 53.343,80.769 R14.2
PULSE: J2.1 SW3.3 | length 26.3
  Top Layer w0.254: J2.1 11.984,83.312 12.669,82.627 19.33,82.627 19.479,82.776 19.479,85.644 19.628,85.793 23.994,85.793 24.096,85.895 25.942,85.895 26.044,85.793 34.197,85.793 SW3.3
REF_OUT: D4.1 R12.2 R13.2 U3.2 | length 28.1
  Top Layer w0.254: R12.2 26.33,67.183 27.559,65.954 R13.2 30.664,65.946 31.115,65.495 D4.1 31.115,64.163 33.197,62.081 39.139,62.081 42.435,65.377 42.435,66.931 44.791,69.287 44.908,69.287 45.347,69.726 U3.2
SCL: J1.2 R15.1 U2.2 | length 16.1
  Top Layer w0.254: J1.2 8.249,60.319 9.154,60.319 10.062,61.227 10.792,61.227 11.697,62.132 11.697,62.862 12.602,63.767 13.56,63.767 13.771,63.556 14.335,63.556 14.811,64.032 14.811,64.493 15.961,65.643 18.018,65.643 R15.1 18.8,66.417 U2.2
SDA: J1.4 R16.1 U2.3 | length 13.1
  Top Layer w0.254: J1.4 11.737,61.267 13.371,61.267 14.319,62.214 14.319,62.282 15.319,63.282 15.319,64.282 16.172,65.135 R16.1 18.994,65.333 19.502,65.333 20.085,65.916 U2.3@20.586,65.916
V_EXT: J5.1 R2.1 SW1.2 | length 28.9
  Top Layer w0.254: R2.1 7.112,65.474 11.176,69.538 J5.1 12.979,72.415 16.557,72.415 22.501,78.359 24.384,78.359 24.765,78.74 SW1.2@24.765,83.864
VBIAS: C2.1 C11.2 C12.2 D5.2 D6.2 J3. J4.2 TP1.1 U1.10 U1.11 U1.12 | length 59.7
  Top Layer w0.254: C2.1 26.43,75.311 26.329,75.412 U1.12 U1.11 U1.10 36.505,74.112 TP1.1 42.164,73.914 v1(42.418,74.168) ; v1(46.736,75.946) 46.736,77.343 47.024,77.631 D6.2 ; D5.2 49.334,67.633 49.946,68.244 49.946,70.647 J3. 50.557,71.744 49.668,71.744 49.254,72.158 49.254,72.368 v1@49.276,72.39 ; C11.2 50.419,64.516 v1(50.8,64.897) ; v1(50.8,75.92) J4.2 52.35,81.935 51.952,82.333 C12.2
  Bottom Layer w0.254: v1(42.418,74.168) 44.958,74.168 v1(46.736,75.946) 46.749,75.933 50.787,75.933 v1(50.8,75.92) 49.254,74.374 v1(49.254,72.263) ; v1(50.8,64.897) J3.
pads on no net: SW1. SW1.1 U1.5
copper on no net: | length 1.3
  Top Layer w0.254: 46.736,81.026 46.736,80.916 47.117,80.535 47.117,79.883
  other v2: 54.356,60.706 3.556,60.833 3,87.043 54.531,87.043

## Polygon pours and split planes (outlines as drawn)
GND on Bottom Layer "GND_L02_P001" (solid, pour order 1): 0.175,60.912 0.175,87.122 cw(c3.175,87.122) 3.175,90.122 54.658,90.122 cw(c54.658,87.122) 57.658,87.122 57.658,60.912 cw(c54.658,60.912) 54.658,57.912 3.175,57.912 cw(c3.175,60.912)
GND on Top Layer "GND_L01_P000" (solid, pour order 0): 0.175,60.912 0.175,87.122 cw(c3.175,87.122) 3.175,90.122 54.658,90.122 cw(c54.658,87.122) 57.658,87.122 57.658,60.912 cw(c54.658,60.912) 54.658,57.912 3.175,57.912 cw(c3.175,60.912)

## Other copper
Multi-Layer:
  the board outline again, w0.254